# Altium PCB PCB_GTV3.3.PcbDoc (part 6 of 11)
Units mil, origin at the board's own origin, x right, y up, seen from the top; angles counter-clockwise.
Board outline 8070.87 x 4881.89 mil, 4 copper layers (Top Layer, GND, PWR, Bottom Layer), stack 61.653 mil thick; 464 components, 293 nets, 1458 pads, 748 vias.
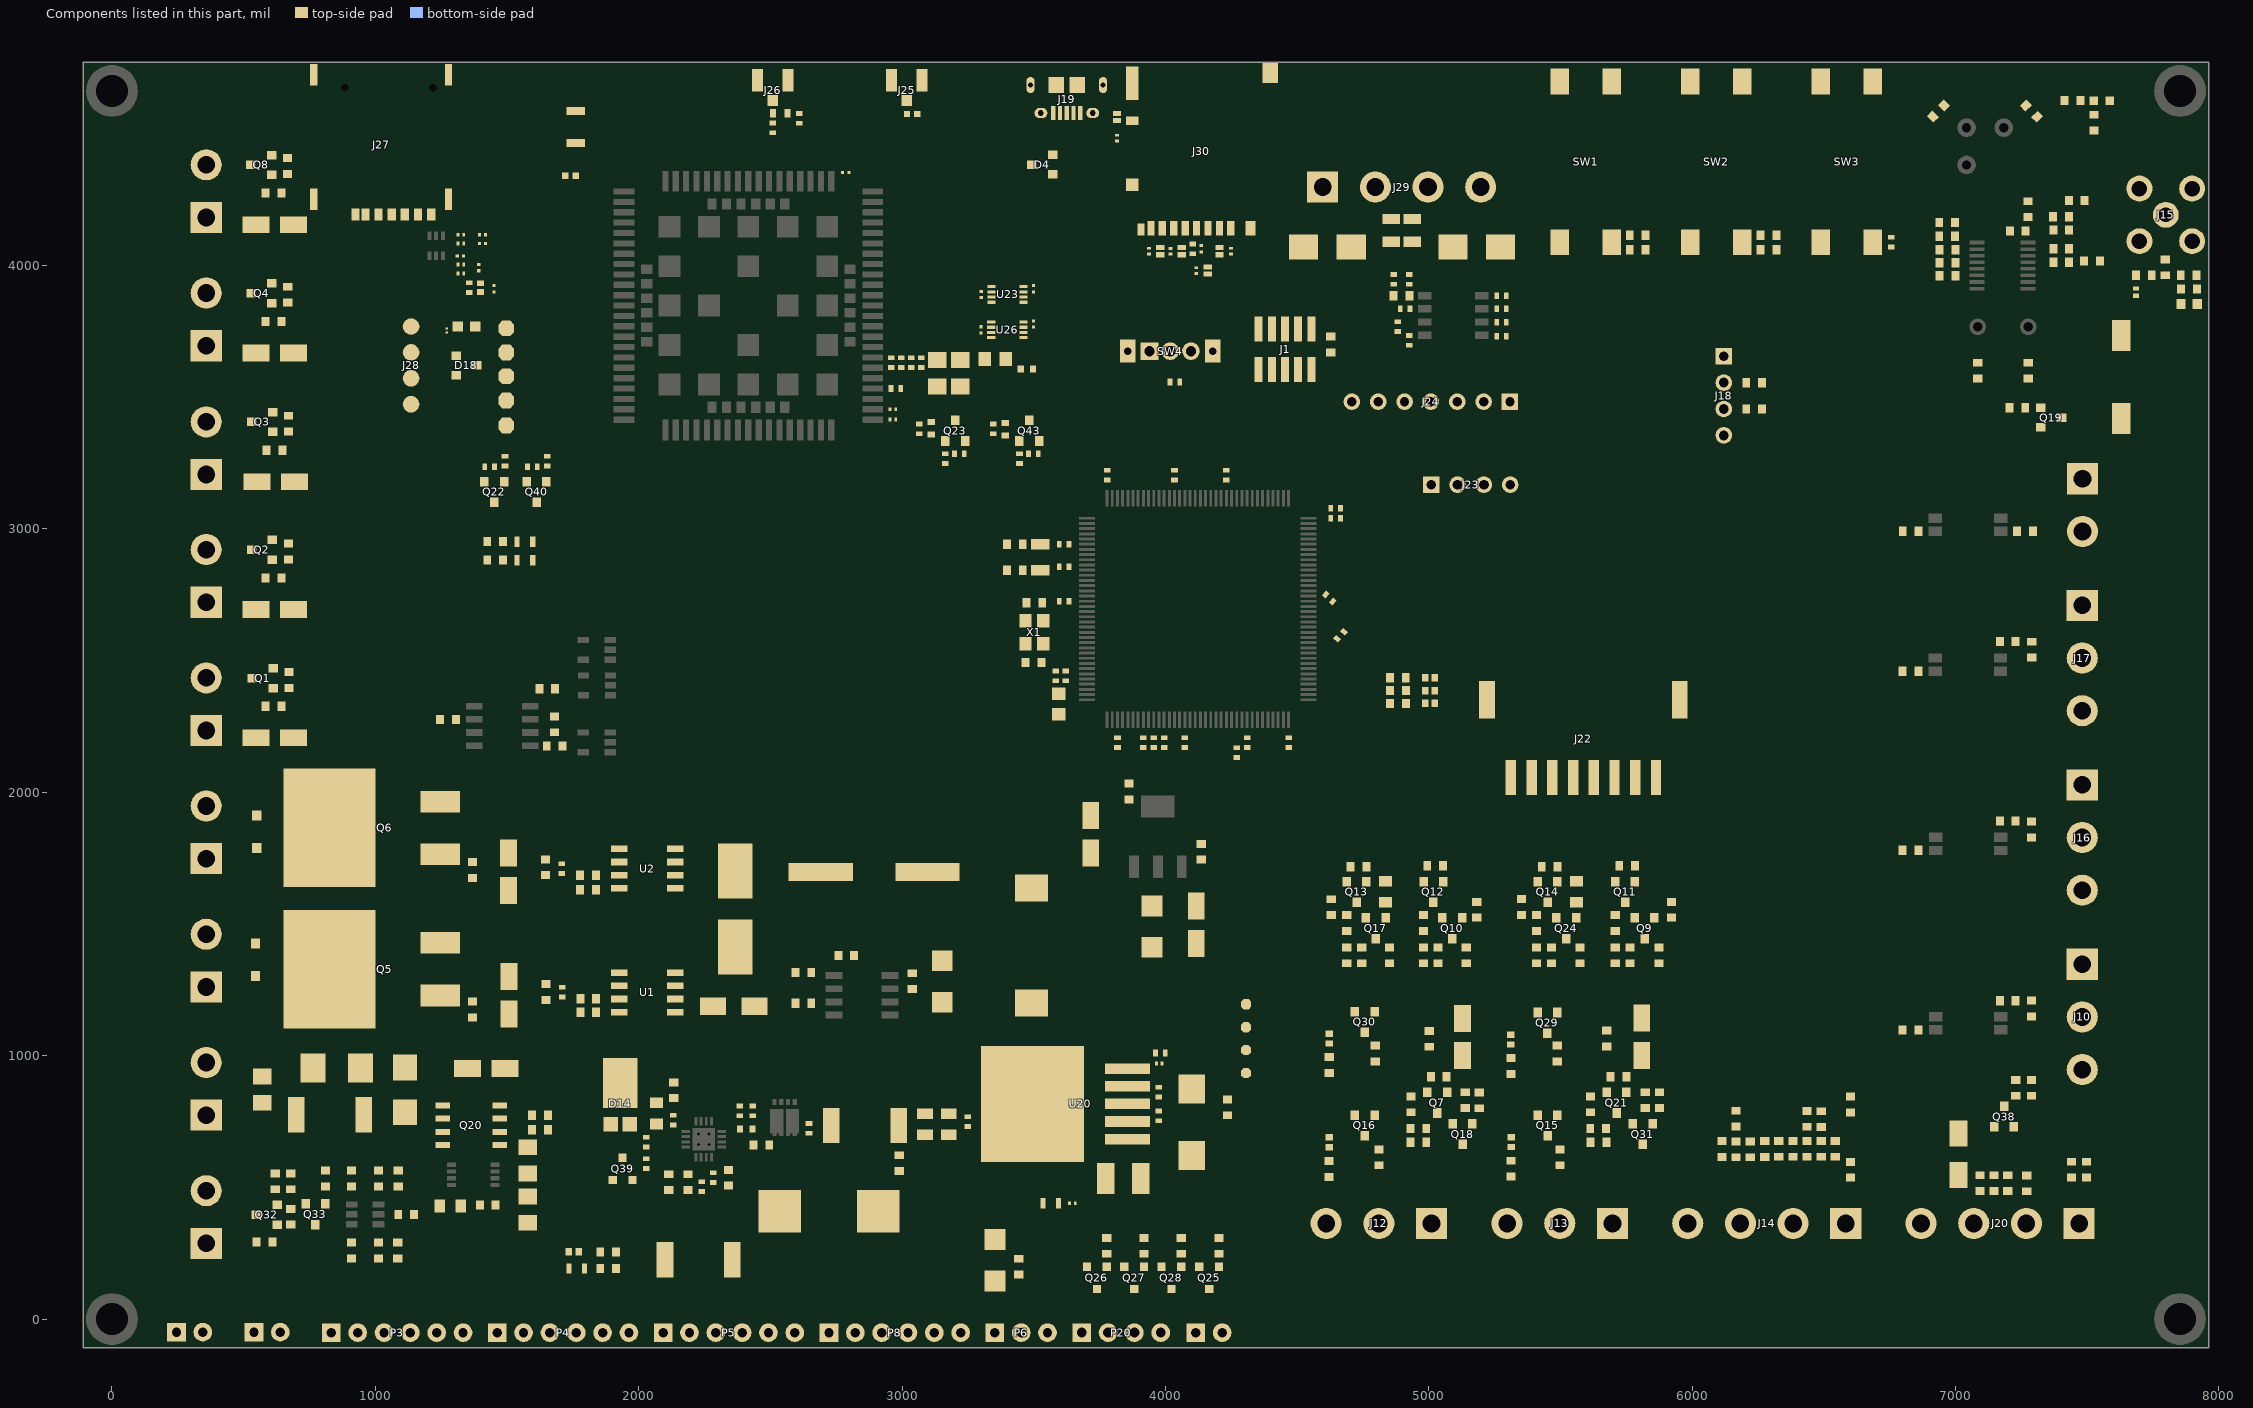
[diagram p4: the components of this part, seen from the top]

## Part data (continued)
R137 R145: library part CRCW0603220RFKEA, "RES SMD 220 OHM 1% 1/10W 0603", Case Code (Imperial)=0603, Case Code (Metric)=1608, LCSC Part Number=C844757, Max Operating Temperature=155°C, Max Power Dissipation=100mW, Min Operating Temperature=-55°C, Package Quantity=5000, Ratings=AEC-Q200, Resistance Tolerance=1%, Resistor Type="Thick Film", Supplier Part Number=71-CRCW0603-220-E3, Temperature Coefficient=100ppm/°C, Voltage Rating=75V, Case/Package=0603, Category="Chip SMD Resistors", ComponentLink1Description=LCSC, ComponentLink2Description=https://datasheet.ciiva.com/11810/0900766b80d98afc-11810631.pdf?src-supplier=Rs, ComponentLink2URL=https://datasheet.ciiva.com/11810/0900766b80d98afc-11810631.pdf?src-supplier=Rs, ComponentLink3Description=https://datasheet.ciiva.com/8339/dcrcwe3-8339957.pdf?src-supplier=Avnet, ComponentLink3URL=https://datasheet.ciiva.com/8339/dcrcwe3-8339957.pdf?src-supplier=Avnet, ComponentLink4Description=https://datasheet.ciiva.com/16222/dcrcwe3-16222278.pdf?src-supplier=Future+Electronics, ComponentLink4URL=https://datasheet.ciiva.com/16222/dcrcwe3-16222278.pdf?src-supplier=Future+Electronics, ComponentLink5Description=https://datasheet.ciiva.com/7777/1697337-7777301.pdf?src-supplier=Element14, ComponentLink5URL=https://datasheet.ciiva.com/7777/1697337-7777301.pdf?src-supplier=Element14, ComponentLink6Description=https://datasheet.ciiva.com/16763/70201119-16763287.pdf?src-supplier=Allied+Electronics, ComponentLink6URL=https://datasheet.ciiva.com/16763/70201119-16763287.pdf?src-supplier=Allied+Electronics, ComponentLink7Description=https://datasheet.ciiva.com/2466/dcrcwe3-2466464.pdf?src-supplier=Digi-Key, ComponentLink7URL=https://datasheet.ciiva.com/2466/dcrcwe3-2466464.pdf?src-supplier=Digi-Key, ComponentLink8Description=https://datasheet.ciiva.com/2466/dcrcwe3-2466465.pdf?src-supplier=Digi-Key, ComponentLink8URL=https://datasheet.ciiva.com/2466/dcrcwe3-2466465.pdf?src-supplier=Digi-Key, ComponentLink9Description=https://datasheet.ciiva.com/2466/dcrcwe3-2466466.pdf?src-supplier=Digi-Key, ComponentLink9URL=https://datasheet.ciiva.com/2466/dcrcwe3-2466466.pdf?src-supplier=Digi-Key, ComponentLink10Description=https://datasheet.ciiva.com/7777/1720486-7777551.pdf?src-supplier=Element14, ComponentLink10URL=https://datasheet.ciiva.com/7777/1720486-7777551.pdf?src-supplier=Element14, ComponentLink11Description=https://datasheet.ciiva.com/26316/fld-crcw-e3-data-en-26316574.pdf?src-supplier=Distrelec, ComponentLink11URL=https://datasheet.ciiva.com/26316/fld-crcw-e3-data-en-26316574.pdf?src-supplier=Distrelec, ComponentLink12Description=https://datasheet.ciiva.com/5550/dcrcwe3-109170-5550773.pdf?src-supplier=Mouser, ComponentLink12URL=https://datasheet.ciiva.com/5550/dcrcwe3-109170-5550773.pdf?src-supplier=Mouser, ComponentLink13Description=https://datasheet.ciiva.com/15159/getdatasheetpartid-45816-15159565.pdf?src-supplier=Verical, ComponentLink13URL=https://datasheet.ciiva.com/15159/getdatasheetpartid-45816-15159565.pdf?src-supplier=Verical, Construction=Rectangular, Contact Plating=Tin, Depth=0.85mm, Features="Automotive AEC-Q200", Height=0.45mm, Item Type=Resistor, Lead Free="Lead Free", Length=1.55mm, Military Standard=Not, Number of Terminations=2, Packaging="Tape and Reel", Power Rating=100mW, Pricing="1=0.1, 10=0.017, 50=0.017, 100=0.01, 1000=0.008, 10000=0.004 (USD)", Radiation Hardening=No, Reach SVHC Compliant=Unknown, RoHS=Yes, RoHS Compliant=Yes, Series=CRCW, Stock=40706, Supplier=Mouser, Technology="THICK FILM", Termination=SMD/SMT, Tolerance=1%, Voltage Rating (DC)=75V, Weight=7.1E-05oz, Width=0.85mm
R143: library part CRCW040210R0FKEDHP, "RES SMD 10 OHM 1% 1/5W 0402", Case Code (Imperial)=0402, Case Code (Metric)=1005, LCSC Part Number=C4013850, Manufacturer="Vishay Dale", Max Operating Temperature=155°C, Max Power Dissipation=200mW, Min Operating Temperature=-55°C, Package Quantity=10000, Power Rating=125mW, Resistance Tolerance=1%, Resistor Type="Thick Film", Supplier Part Number 1=541-10.0YCT-ND, Temperature Coefficient=100ppm/°C, Voltage Rating=50V, Case/Package=0402, ComponentLink1Description=http://www.mouser.com/ds/2/427/crcwhpe3-46056.pdf?src-supplier=Mouser, ComponentLink1URL=http://www.mouser.com/ds/2/427/crcwhpe3-46056.pdf?src-supplier=Mouser, Construction=Rectangular, Contact Plating=Tin, Depth=0.5mm, Features="Automotive AEC-Q200", Height=0.3mm, Lead Free="Lead Free", Length=1mm, Manufacturer Part Number=CRCW040210R0FKEDHP, Military Standard=Not, Mount="Surface Mount", Number of Terminations=2, Packaging="Tape and Reel", Pricing 1="1=0.15, 10=0.132, 100=0.0506, 1000=0.02226, 2500=0.01923, 5000=0.0172 (USD)", Radiation Hardening=No, REACH SVHC=Unknown, Resistance=10R, RoHS Compliant=Yes, Series=CRCW-HP, Stock 1=28500, Supplier 1=Digi-Key, Technology="THICK FILM", Termination=SMD/SMT, Tolerance=1%, Voltage Rating (DC)=50V, Weight=2.3E-05oz, Width=0.5mm
R148 R149: library part 25121WJ0000T4E, "1W Thick Film Resistors ±5% ±800ppm/℃ 0Ω 2512 Chip Resistor - Surface Mount ROHS", LCSC Part Number=C25469, Manufacturer=UNI-ROYAL, Package=2512, ComponentLink1Description=LCSC, ComponentLink1URL=https://www.lcsc.com/product-detail/Chip-Resistor-Surface-Mount_UNI-ROYAL-Uniroyal-Elec-25121WJ0000T4E_C25469.html, Item Type=Resistor, Manufacturer Part Number=25121WJ0000T4E
R150 R151 R152 R153: library part RC0201FR-0722RL, "RES 22 OHM 1% 1/20W 0201", LCSC Part Number=C155743, Manufacturer=Yageo, Supplier Part Number=5973409, Category="Chip SMD Resistors", ComponentLink1Description=https://datasheet.ciiva.com/7672/1563626-7672215.pdf?src-supplier=Element14, ComponentLink1URL=https://datasheet.ciiva.com/7672/1563626-7672215.pdf?src-supplier=Element14, Item Type=Resistor, Manufacturer Part Number=RC0201FR-0722RL, Pricing="10000=0.0014, 50000=0.0013, 250000=0.0013, 750000=0.0012, 2000000=0.0011 (USD)", RoHS=Yes, Stock=17980000, Supplier="Future Electronics"
R156 R157 R158 R159 R160: library part RC0201FR-0710KL, "RES SMD 10K OHM 1% 1/20W 0201", LCSC Part Number=C106225, Manufacturer=Yageo, Package=0201, ComponentLink7Description=LCSC, ComponentLink7URL=https://www.lcsc.com/product-detail/Chip-Resistor-Surface-Mount_YAGEO-RC0201FR-0710KL_C106225.html, Item Type=Resistor, Manufacturer Part Number=RC0201FR-0710KL
SB2 SB3 SB4 SB5 SB6 SB7 SB8 SB9 SB16 SB17 SB18 SB19 SB20 SB35 SB36 SB37 SB38 SB39 SB40 SB41 SB42 SB43 SB44: "Solder Bridge ON"
SW1 SW2 SW3: library part TL3300CF160Q, "SWITCH TACTILE SPST-NO 0.05A 12V", Case/Package=SMD/SMT, Contact Resistance=100mR, Current Rating=50mA, Manufacturer=E-Switch, Max Operating Temperature=70°C, Max Voltage Rating (DC)=12V, Min Operating Temperature=-25°C, Operating Force=160gf, Package Quantity=1, Supplier Part Number 1=612-TL3300CF160Q, Actuator Length=5mm, Actuator Type=Standard, ComponentLink1Description=http://www.e-switch.com/system/asset/product_line/data_sheet/157/TL3300.pdf?src-supplier=Digi-Key, ComponentLink1URL=http://www.e-switch.com/system/asset/product_line/data_sheet/157/TL3300.pdf?src-supplier=Digi-Key, ComponentLink2Description=http://spec_sheets.e-switch.com/specs/N301102.pdf?src-supplier=Digi-Key, ComponentLink2URL=http://spec_sheets.e-switch.com/specs/N301102.pdf?src-supplier=Digi-Key, Contact Plating=Silver, Electrical Life=200000Cycles, Illumination Type=Non-Illuminated, Lead Free="Lead Free", Manufacturer Part Number=TL3300CF160Q, Mechanical Life=200000Cycles, Mount="Surface Mount", Orientation=Straight, Packaging="Tape and Reel", Pricing 1="1=0.53, 10=0.513, 50=0.43, 100=0.393, 1000=0.293, 10000=0.274 (USD)", RoHS Compliant=Yes, Series=TL3300, Stock 1=1884, Supplier 1=Mouser, Switch Function=Off-Mom, Switch Travel=0.35mm, Termination="Gull Wing", Throw Configuration=SPST, Voltage Rating (DC)=12V
SW4: library part SS-12D02-G040, "Straight 1A SPDT 8.7mm 8.6mm 24V 4.5mm Black PCPin 10000 Rectangular columnar -25℃~+70℃ Plugin Slide Switches ROHS", LCSC Part Number=C2876023, Manufacturer=G-Switch, Package=Custom, ComponentLink1Description=LCSC, ComponentLink1URL=https://www.lcsc.com/product-detail/Slide-Switches_G-Switch-SS-12D02-G040_C2876023.html, Item Type=Switch, Manufacturer Part Number=SS-12D02-G040
U1 U2: "SENSOR CURRENT HALL 20A DC", Case/Package=SOIC, Current Sensing=20A, Frequency=80kHz, Manufacturer="Allegro MicroSystems", Max Operating Temperature=150°C, Max Supply Current=14mA, Min Operating Temperature=-40°C, Supplier Part Number 1=620-1645-1-ND, Accuracy=3%, Category="Current Sensors", ComponentLink1Description=http://www.farnell.com/datasheets/2838158.pdf?src-supplier=Farnell, ComponentLink1URL=http://www.farnell.com/datasheets/2838158.pdf?src-supplier=Farnell, ComponentLink2Description=http://www.farnell.com/datasheets/2838158.pdf?src-supplier=Newark, ComponentLink2URL=http://www.farnell.com/datasheets/2838158.pdf?src-supplier=Newark, ComponentLink3Description=http://www.allegromicro.com/~/media/Files/Datasheets/ACS723-Datasheet.ashx?src-supplier=Digi-Key, ComponentLink3URL=http://www.allegromicro.com/~/media/Files/Datasheets/ACS723-Datasheet.ashx?src-supplier=Digi-Key, ComponentLink4Description=https://www.allegromicro.com/~/media/Files/Datasheets/ACS723-Datasheet.ashx?src-supplier=Digi-Key, ComponentLink4URL=https://www.allegromicro.com/~/media/Files/Datasheets/ACS723-Datasheet.ashx?src-supplier=Digi-Key, Linearity=1%, Manufacturer Part Number=ACS723LLCTR-20AU-T, Mount="Surface Mount", Number of Channels=1, Number of Pins=8, Packaging="Tape and Reel", Polarity=Unidirectional, Pricing 1="1=4.46000, 5=3.94000, 10=3.47900, 25=2.82280, 50=2.49480, 100=2.42900, 500=2.03516, 1000=1.90385 (USD)", Response Time=5us, RoHS=Yes, RoHS Compliant=Yes, Sensitivity=200mV/A, Supplier 1=Digi-Key